# Altium PCB LDCFullN.PcbDoc (part 2 of 2)
Units mm, origin at the board's own origin, x right, y up, seen from the top; angles counter-clockwise.
Board outline 42.47 x 36.98 mm, 4 copper layers (Top Layer, GND, Power, Bottom Layer), stack 1.579 mm thick; 85 components, 54 nets, 294 pads, 82 vias.
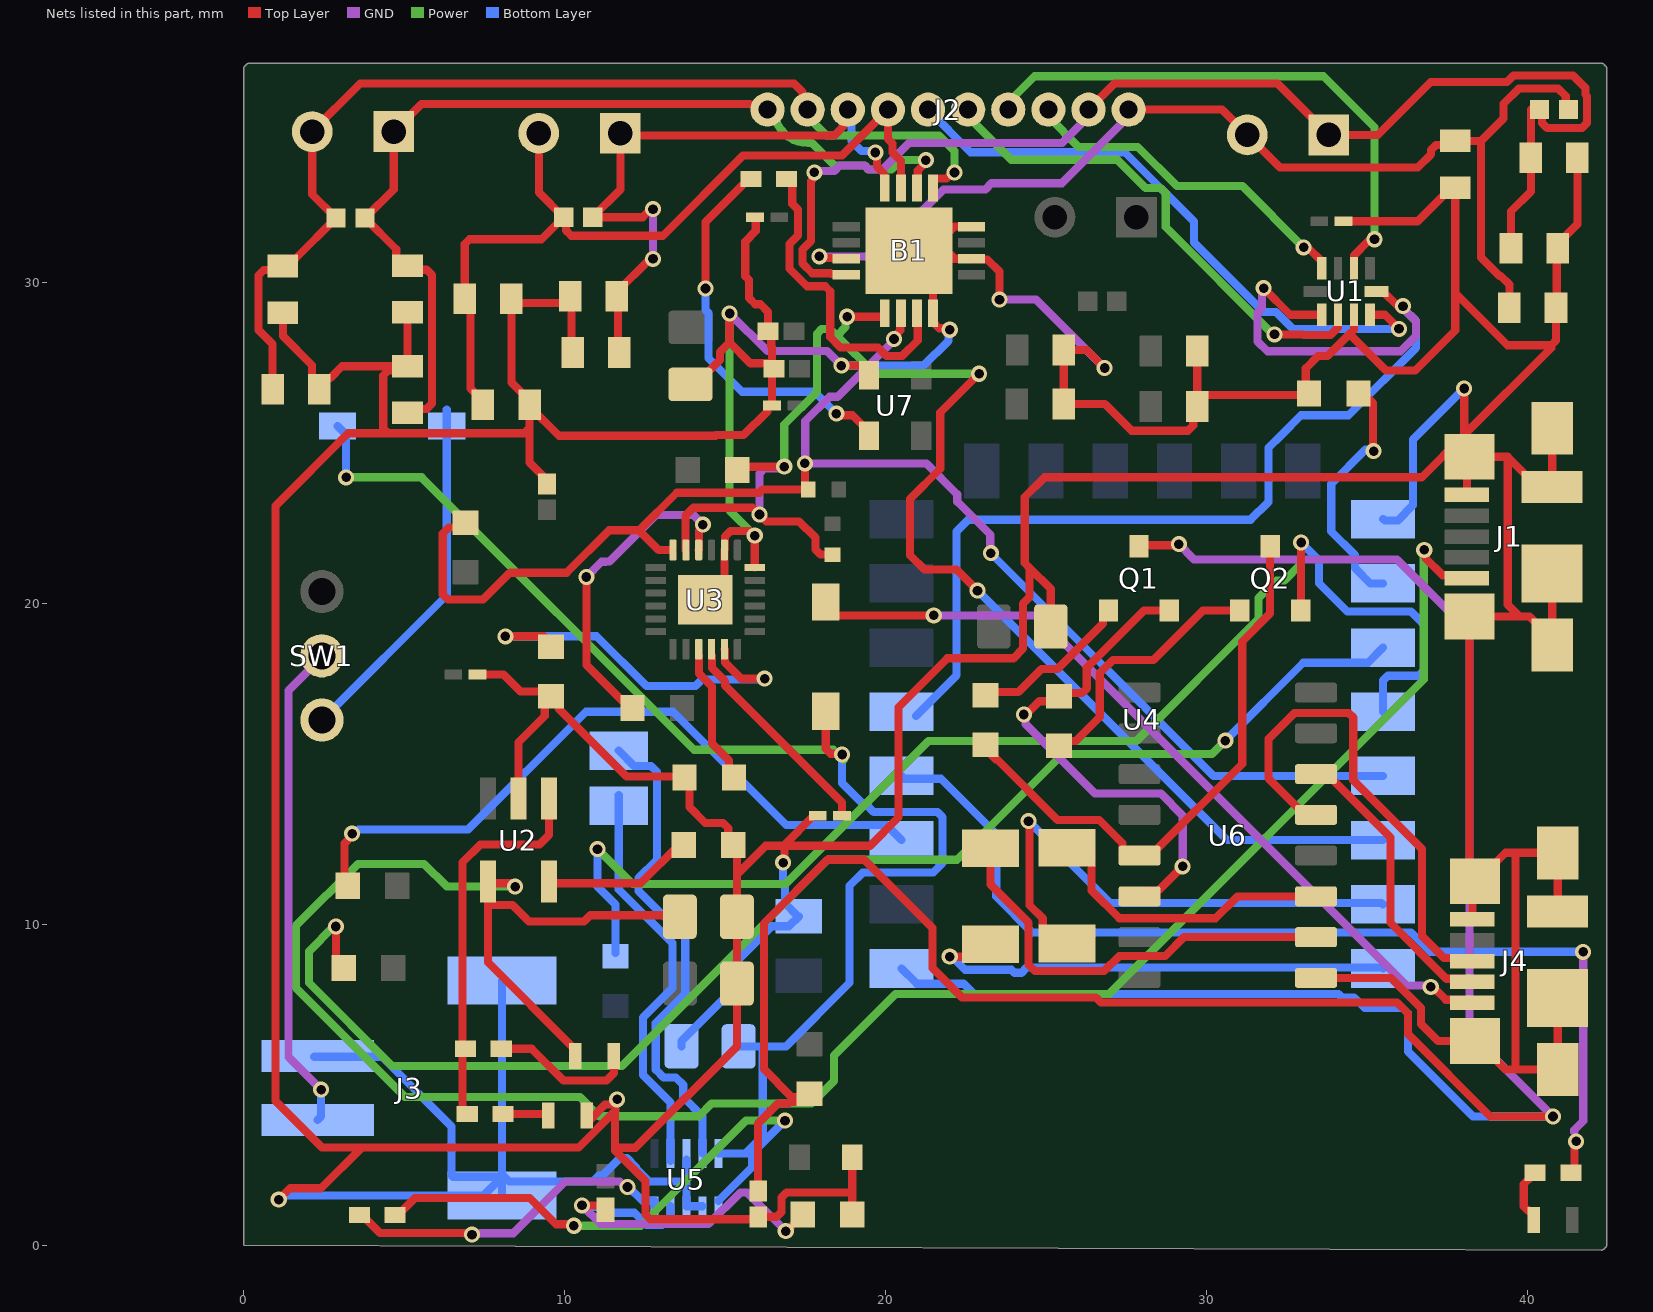
[diagram p4: the nets of this part, all layers, seen from the top]

## Via types
v1: diameter 0.5, hole 0.3, Top Layer to Bottom Layer, 81 vias
v2: diameter 0.5, hole 0.3, Top Layer to Bottom Layer, tented both sides, 1 vias

## Nets (pads, with @x,y where several pads share a name; then routed paths per layer and width w, separated by ;. In a path a pad name is that pad's centre, name@x,y a point inside that pad or via, vN(x,y) a via of type N, cw(c..) or ccw(c..) an arc to the next point about the centre after c; other vN are vias at no path point) (continued)
GND: B1.4 B1.6 B1.8 B1.17 C1.1 C2.1 C3.1 C4.1 C5.1 C8.2 C9.2 C10.2 C11.2 C12.1 C13.1 C14.1 C15.1 C16.1 C17.1 C18.1 C20.1 C21.1 C23.2 C24.2 C25.2 C26.2 C27.1 C28.1 C29.2 C30.2 C31.1 C32.1 C33.1 C35.2 C36.2 C50.2 J1.5 J1.S1 J1.S2 J1.S3 J1.S4 J1.S5 J1.S6 J3.1 J3.S1 J3.S2 J4.5 J4.S1 J4.S2 J4.S3 J4.S4 J4.S5 J4.S6 R8.1 R14.1 R15.1 R19.1 R22.1 R24.1 U1.3 U2.2 U3.18 U3.20 U3.25 U4.15 U5.2 U5.3 U5.8 U6.1 U7.2 | length 334.2
  Top Layer w0.254: v1(1.092,1.422) 1.448,1.778 2.413,1.778 3.683,3.048 ; C3.1@1.219,29.058 1.219,28.325 2.128,27.417 2.128,26.898 C2.1@2.227,26.798 ; C2.1@2.352,26.798 2.577,27.023 2.705,27.023 3.069,27.387 C9.2@5.105,27.387 ; C10.2@5.105,29.068 C9.2@5.105,27.387 ; C15.1@7.287,17.78 8.091,17.78 8.617,17.253 9.324,17.253 R15.1@9.512,17.065 ; C13.1@8.34,29.488 C13.1@8.34,29.362 ; U2.2@8.56,13.969 8.56,15.672 9.379,16.491 9.379,16.85 9.594,17.065 R15.1@9.619,17.065 ; C14.1@9.449,23.77 9.449,23.847 8.905,24.39 8.905,25.466 ; 9.811,16.72 11.925,14.605 13.555,14.605 13.883,14.277 13.883,13.65 14.379,13.155 14.936,13.155 15.098,12.993 15.098,12.723 15.35,12.471 15.367,12.471 15.367,11.557 ; C23.2@10.246,27.813 10.208,27.851 10.208,29.527 C24.2@10.17,29.566 9.967,29.362 C13.1@8.34,29.362 ; R14.1@10.785,3.909 11.261,4.386 11.406,4.386 11.567,4.547 v1(11.633,4.547) 11.586,4.5 11.586,4.195 11.572,4.18 ; C50.2@13.856,26.597 14.839,27.58 14.839,27.834 15.138,28.134 ; U3.25@14.376,20.117 14.976,20.717 U3.20@14.976,21.662 14.989,21.675 14.989,22.08 15.168,22.259 15.773,22.259 v1(15.921,22.11) U3.18@15.921,21.117 ; v1(15.138,29.032) 15.138,28.134 ; C1.1@15.366,8.153 C20.1@15.366,10.236 ; C1.1@15.366,8.153 15.367,6.198 12.211,3.042 11.572,3.042 ; C20.1@15.366,10.236 15.367,11.557 ; C27.1@15.951,32.055 15.951,31.598 15.627,31.274 15.627,30.19 15.739,30.078 15.739,29.515 15.936,29.318 16.097,29.318 16.337,29.078 C32.1@16.337,28.473 16.437,28.373 16.437,28.013 16.464,27.986 16.464,27.646 16.462,27.644 C28.1@16.462,27.305 ; C29.2@16.004,0.813 12.665,0.813 12.516,0.962 12.516,2.004 11.572,2.947 11.572,3.042 ; C29.2@16.027,0.888 16.605,0.888 16.754,1.037 16.754,1.486 16.916,1.649 18.961,1.649 ; v1(16.804,11.923) 16.846,11.964 16.846,12.446 ; C21.1@17.884,13.386 17.76,13.386 16.846,12.471 16.846,12.446 ; v1(18.618,27.407) 19.292,27.407 19.482,27.216 U7.2@19.482,27.153 ; R24.1@18.961,0.939 18.961,1.649 ; C35.2@18.961,2.743 18.961,1.649 ; B1.17@20.726,30.988 21.476,31.738 22.149,31.738 ; v1(21.996,28.524) 21.949,28.571 21.668,28.571 21.476,28.763 B1.4@21.476,29.038 21.476,30.265 21.949,30.738 22.149,30.738 ; B1.6@22.676,30.738 B1.6@22.653,30.738 ; B1.8@22.676,31.738 22.149,31.738 ; v1(23.546,29.464) 23.546,30.335 23.166,30.715 22.676,30.715 B1.6@22.653,30.738 ; 24.333,23.285 24.333,21.26 24.486,21.107 ; 24.333,23.31 24.95,23.927 36.703,23.927 J1.S2@38.024,25.248 ; C36.2@25.145,19.279 25.145,20.448 24.486,21.107 ; v1(26.822,27.33) 26.264,27.889 C5.1@25.552,27.889 25.547,27.884 25.547,26.218 C4.1@25.542,26.213 26.827,26.213 27.661,25.38 29.42,25.38 29.583,25.542 29.583,26.011 C11.2@29.708,26.137 C11.2@29.708,26.265 ; C8.2@29.708,27.864 C11.2@29.708,26.265 ; U6.1@33.408,8.331 35.742,8.331 36.677,7.396 36.677,6.896 37.207,6.367 J4.S1@38.363,6.367 ; C31.1@34.262,31.902 36.565,31.902 37.389,32.727 37.616,32.954 C18.1@37.744,32.954 37.744,29.673 ; U1.3@34.591,28.991 34.589,28.989 34.589,28.523 34.453,28.387 ; v1(38.024,26.695) J1.S2@38.024,25.248 ; J1.5@38.107,23.38 38.107,24.482 J1.S2@38.192,24.567 ; J4.5@38.278,10.154 38.278,11.257 J4.S2@38.363,11.342 38.192,11.512 J1.S1@38.192,19.592 39.751,19.592 ; J4.S1@38.425,6.367 39.313,5.479 39.628,5.479 ; J4.S2@38.425,11.342 39.313,12.229 39.628,12.229 ; J1.S3@40.767,18.705 J1.S3@40.767,18.88 ; J1.S4@40.767,20.93 J1.S3@40.767,18.88 ; J1.S6@40.767,25.455 J1.S5@40.767,23.63 40.317,23.63 39.38,24.567 ; J4.S4@40.938,7.704 J4.S3@40.938,5.479 39.628,5.479 ; J4.S5@40.938,10.404 J4.S6@40.938,12.229 39.628,12.229 ; C26.2@41.554,34.112 41.554,31.812 40.935,31.193 C25.2@40.935,31.064 40.909,31.039 40.909,29.235 C16.1@40.884,29.21 40.884,28.19 40.735,28.042 ; 3.683,3.048 2.438,3.048 0.991,4.496 0.991,23.038 3.251,25.298 8.738,25.298 8.893,25.454 ; 3.683,3.048 10.439,3.048 11.572,4.18 ; C9.2@5.105,27.387 4.98,27.261 4.511,27.261 4.348,27.099 4.348,25.454 4.497,25.305 8.741,25.305 8.89,25.454 8.893,25.454 ; C13.1@8.34,29.362 8.34,26.882 8.905,26.316 C12.1@8.905,26.187 ; 8.893,25.454 8.905,25.466 ; 8.905,25.466 C12.1@8.905,26.187 ; C12.1@8.905,26.187 8.905,26.135 9.818,25.222 14.696,25.222 14.717,25.243 15.575,25.243 16.312,25.981 16.312,26.137 16.338,26.162 C17.1@16.462,26.162 C28.1@16.462,27.305 ; 11.572,3.042 11.572,4.18 ; 15.138,28.134 15.794,27.478 16.289,27.478 C28.1@16.462,27.305 ; 15.367,11.557 16.256,12.446 16.846,12.446 ; 16.846,12.446 19.507,12.446 20.396,13.335 20.396,16.764 21.92,18.288 23.978,18.288 24.282,18.593 24.282,19.99 24.486,20.193 24.486,21.107 ; 22.149,30.738 21.946,30.941 21.946,31.535 22.149,31.738 ; 22.149,30.738 B1.6@22.653,30.738 ; C11.2@29.708,26.265 29.933,26.49 30.23,26.49 33.035,26.49 33.088,26.543 33.088,27.322 33.467,27.701 33.767,27.701 34.453,28.387 ; 34.453,28.387 35.585,27.254 36.5,27.254 37.744,28.499 37.744,29.673 ; 37.744,29.673 39.376,28.042 40.735,28.042 ; J1.S2@38.024,25.248 40.735,27.959 40.735,28.042 ; J1.S2@38.024,25.248 38.024,24.735 J1.S2@38.192,24.567 ; J1.S2@38.192,24.567 39.38,24.567 ; 39.38,24.567 39.38,19.964 39.751,19.592 ; 39.628,5.479 39.628,12.229 ; 39.751,19.592 40.055,19.592 J1.S3@40.767,18.88
  GND w0.254: v1(15.138,29.032) 16.314,27.857 18.168,27.857 v1(18.618,27.407) ; v1(23.546,29.464) 24.689,29.464 v1(26.822,27.33)
  Power w0.254: v1(15.138,29.032) 15.138,22.893 v1(15.921,22.11)
  Bottom Layer w0.254: v1(1.092,1.422) 1.159,1.422 1.286,1.549 7.468,1.549 J3.S2@8.052,2.134 ; J3.1@2.2,5.874 4.311,5.874 6.479,3.707 6.479,2.172 6.518,2.134 J3.S2@8.052,2.134 ; J3.S2@8.052,1.549 8.052,2.062 8.126,2.136 8.274,1.988 10.88,1.988 11.064,2.172 11.18,2.172 11.727,2.718 11.937,2.718 12.214,2.442 12.214,2.412 12.633,1.993 13.741,1.993 ; J3.S1@8.052,8.249 J3.S2@8.052,2.134 ; C33.1@13.641,6.198 13.641,6.363 15.247,7.969 15.247,8.73 16.459,9.942 16.99,9.942 C30.2@17.297,10.249 17.272,10.249 16.866,10.655 16.866,11.165 16.804,11.226 v1(16.804,11.923) ; U5.3@13.792,1.388 13.792,1.942 13.741,1.993 ; U5.3@13.794,1.215 U5.2@14.294,1.215 ; U5.8@13.794,2.665 13.794,2.046 13.741,1.993 ; v1(18.618,27.407) 21.184,27.407 21.957,28.18 21.957,28.484 v1(21.996,28.524) ; U4.15@35.496,22.623 35.56,22.585 35.96,22.585 36.433,23.058 36.433,25.105 v1(38.024,26.695)
GPIO0: Q2.2 R20.1 U4.18 | length 42.3
  Top Layer w0.254: Q2.2@32.929,19.777 32.944,19.792 v1(32.944,21.895)
  Power w0.254: v1(11.024,12.344) 12.116,11.252 16.879,11.252 21.339,15.712 27.811,15.712 31.62,19.521 31.62,20.164 32.173,20.717 32.427,20.717 32.944,21.234 v1(32.944,21.895)
  Bottom Layer w0.254: v1(11.024,12.344) 11.024,11.172 11.582,10.613 R20.1@11.582,9.101 ; v1(32.944,21.895) 33.502,21.336 33.502,20.626 34.381,19.746 36.365,19.746 36.773,19.338 36.773,17.909 36.611,17.746 35.645,17.746 35.496,17.598 U4.18@35.496,16.623
GPIO2: R36.2 U4.17 | length 43.4
  Top Layer w0.254: v1(2.87,9.931) 2.87,8.78 R36.2@3.014,8.636
  Power w0.254: v1(2.87,9.931) 2.804,9.931 2.032,9.16 2.032,8.179 4.62,5.59 11.788,5.59 18.209,12.011 22.22,12.011 25.517,15.308 30.167,15.308 v1(30.582,15.723)
  Bottom Layer w0.254: v1(30.582,15.723) 33.009,18.15 35.023,18.15 U4.17@35.496,18.623
GPIO14: U1.1 U1.5 U4.5 | length 36.7
  Top Layer w0.254: v1(31.775,29.82) 32.604,28.991 U1.1@33.591,28.991 ; U1.5@35.293,29.718 35.496,29.718 35.953,29.261 v1(36.119,29.261)
  GND w0.254: v1(31.775,29.82) 31.728,29.773 31.728,29.203 31.587,29.062 31.587,28.162 31.896,27.853 36.041,27.853 36.519,28.331 36.519,28.794 36.119,29.194 v1(36.119,29.261)
  Bottom Layer w0.254: U4.5@20.942,16.494 22.206,17.758 22.206,22.235 22.577,22.606 31.373,22.606 31.928,23.161 31.928,24.847 32.331,25.25 32.941,25.86 34.417,25.86 36.519,27.961 36.519,28.794 36.119,29.194 v1(36.119,29.261)
GPIO16: R37.2 U4.4 | length 31.4
  Top Layer w0.254: R37.2@41.348,2.261 41.463,2.375 41.463,3.193 v1(41.51,3.24) ; v1(41.732,9.144) v1@41.74,9.144
  GND w0.254: 41.453,3.531 41.453,3.597 41.732,3.877 v1(41.732,9.144)
  Bottom Layer w0.254: U4.4@20.496,14.623 20.585,14.535 21.728,14.535 23.444,12.819 23.444,10.868 24.565,9.746 36.365,9.746 36.967,9.144 v1(41.732,9.144)
I1: B1.11 C12.2 C13.2 C19.2 C39.2 J2.7 | length 26.7
  Top Layer w0.254: C13.2@6.886,29.488 6.886,31.195 7.035,31.344 9.281,31.344 C19.2@9.968,32.029 ; C13.2@7.068,29.761 7.068,26.689 7.217,26.54 7.228,26.54 7.452,26.316 C12.2@7.452,26.187 ; C39.2@9.195,34.646 9.195,32.801 C19.2@9.968,32.029 ; B1.11@20.476,32.938 20.476,33.78 20.212,34.044 20.212,34.326 20.07,34.468 J2.7@20.07,35.382 18.641,33.953 15.559,33.953 13.058,31.452 10.206,31.452 10.043,31.615 10.043,32.029 10.006,32.067 C19.2@9.968,32.029 C19.2@9.968,32.029
I2: B1.12 C19.1 C23.1 C24.1 C39.1 J2.8 | length 21.1
  Top Layer w0.254: C19.1@10.871,32.029 C19.1@10.873,32.029 ; C23.1@11.699,27.685 11.661,27.723 11.661,29.527 C24.1@11.623,29.566 11.623,29.694 12.663,30.734 v1(12.751,30.734) ; v1(12.751,32.283) 12.684,32.283 12.43,32.029 C19.1@10.873,32.029 ; J2.8@18.82,35.382 18.664,35.227 18.664,34.836 18.4,34.572 11.809,34.572 C39.1@11.735,34.646 11.735,32.891 C19.1@10.873,32.029 ; v1(19.681,34.047) 19.728,34 19.728,33.609 19.953,33.383 19.953,32.961 B1.12@19.976,32.938
  GND w0.254: v1@12.751,30.6 v1(12.751,32.283)
  Bottom Layer w0.254: J2.8@18.82,35.382 18.939,35.263 18.939,34.401 19.245,34.095 19.634,34.095 v1(19.681,34.047)
IN0A: B1.9 C2.2 C3.2 C6.2 C37.2 J2.9 | length 33.4
  Top Layer w0.254: C2.2@0.899,26.67 0.899,28.074 0.462,28.511 0.462,30.223 0.624,30.385 1.094,30.385 C3.2@1.219,30.511 1.444,30.735 1.606,30.735 C6.2@2.876,32.004 ; C6.2@2.876,32.004 C6.2@2.876,32.004 ; J2.9@17.57,35.382 17.414,35.538 17.414,35.926 17.147,36.193 3.63,36.193 C37.2@2.134,34.696 2.134,32.745 C6.2@2.876,32.004 ; B1.9@21.476,32.938 21.476,33.213 21.499,33.236 21.892,33.236 22.078,33.422 v1(22.144,33.422)
  Power w0.254: J2.9@17.57,35.382 17.57,35.163 18.161,34.572 19.155,34.572 19.158,34.574 19.731,34.574 19.734,34.572 21.664,34.572 22.144,34.091 v1(22.144,33.422)
IN0B: B1.10 C6.1 C9.1 C10.1 C37.1 J2.10 | length 29.9
  Top Layer w0.254: C6.1@3.779,32.004 C6.1@3.779,32.004 ; C9.1@5.105,25.933 5.231,26.059 5.7,26.059 5.862,26.221 5.862,30.233 5.7,30.395 5.231,30.395 C10.1@5.105,30.521 4.977,30.521 4.752,30.745 4.752,31.032 C6.1@3.779,32.004 ; J2.10@16.32,35.382 16.164,35.538 15.784,35.538 15.765,35.558 5.535,35.558 C37.1@4.674,34.696 4.674,32.897 C6.1@3.779,32.004 ; B1.10@20.976,32.938 20.999,32.961 20.999,33.489 21.251,33.741 v1(21.251,33.807)
  Power w0.254: J2.10@16.32,35.382 cw(c16.302,35.129) 16.551,35.18 ccw(c17.57,35.382) 17.586,34.343 17.595,34.343 ; 17.596,34.343 17.701,34.343 18.407,33.637 19.35,33.637 19.467,33.52 20.182,33.52 20.469,33.807 v1(21.251,33.807)
IN3A: B1.15 C16.2 C18.2 C22.2 C40.2 J2.1 | length 34.7
  Top Layer w0.254: v1(17.932,30.81) 17.979,30.763 18.251,30.763 18.253,30.761 18.73,30.761 B1.15@18.776,30.715 ; J2.1@27.57,35.382 30.48,35.382 C40.2@31.267,34.595 32.283,33.579 36.576,33.579 36.987,33.99 36.987,34.119 37.15,34.282 37.619,34.282 C18.2@37.744,34.407 38.547,34.407 ; C16.2@39.431,29.21 39.431,29.937 39.164,30.203 39.119,30.203 38.547,30.775 38.547,34.407 ; C22.2@41.275,35.382 41.188,35.382 41.188,35.808 40.952,36.045 39.725,36.045 39.246,35.565 39.246,35.106 38.547,34.407
  GND w0.254: v1(17.932,30.81) 20.091,30.81 20.394,31.113 20.394,31.492 21.798,32.895 23.107,32.895 23.302,33.09 25.497,33.09 27.57,35.163 J2.1@27.57,35.382
IN3B: B1.16 C22.1 C25.1 C26.1 C40.1 J2.2 | length 39.4
  Top Layer w0.254: v1(17.78,33.426) 17.733,33.379 17.733,33.217 17.67,33.155 17.67,31.293 17.405,31.028 17.405,30.592 17.714,30.283 18.285,30.283 18.308,30.261 18.753,30.261 B1.16@18.776,30.238 ; J2.2@26.32,35.382 27.13,36.193 32.21,36.193 C40.1@33.807,34.595 35.331,34.595 36.982,36.246 39.355,36.246 39.558,36.449 41.412,36.449 41.8,36.062 41.8,35.851 41.854,35.797 41.854,34.967 41.691,34.805 40.609,34.805 40.447,34.967 40.447,35.307 C22.1@40.372,35.382 40.101,35.382 40.101,33.884 40.101,32.835 39.482,32.216 C25.1@39.482,31.064
  GND w0.254: v1(17.78,33.426) 17.827,33.473 18.402,33.473 18.565,33.637 19.346,33.637 19.463,33.52 19.899,33.52 20.722,34.343 25.5,34.343 26.32,35.163 J2.2@26.32,35.382
M1: J2.5 U1.2 | length 15.7
  Top Layer w0.254: v1(32.114,28.38) 33.005,28.38 33.024,28.361 33.856,28.361 34.089,28.594 34.089,28.989 U1.2@34.091,28.991
  Power w0.254: J2.5@22.57,35.382 22.57,35.163 23.914,33.818 27.218,33.818 28.095,32.941 28.563,32.941 28.725,32.779 28.725,31.727 32.072,28.38 v1(32.114,28.38)
M2: J2.6 U1.4 | length 19
  Top Layer w0.254: U1.4@35.091,28.991 35.551,28.991 v1(35.992,28.55)
  Bottom Layer w0.254: J2.6@21.32,35.382 22.647,34.055 27.449,34.055 29.612,31.892 29.612,31.238 31.774,29.075 32.164,29.075 32.69,28.55 v1(35.992,28.55)
NegD: J4.2 U6.6 | length 9.1
  Top Layer w0.254: U6.6@33.408,14.681 33.753,14.681 35.729,12.705 35.729,10.05 37.477,8.302 38.18,8.302 J4.2@38.278,8.204
NetB1_3: B1.3 R3.2 | length 10.1
  Top Layer w0.254: R3.2@16.914,33.223 16.965,33.223 17.092,33.096 17.092,32.446 17.266,32.272 17.266,31.461 17.001,31.196 17.001,30.425 17.547,29.879 18.118,29.879 18.274,29.723 18.274,28.296 18.598,27.972 19.766,27.972 20.029,27.708 20.515,27.708 20.999,28.193 20.999,29.015 B1.3@20.976,29.038
NetC20_2: C20.2 J1.1 R10.2 U2.4 | length 71.8
  Top Layer w0.254: U2.4@7.61,11.278 8.289,11.278 8.392,11.176 v1(8.458,11.176) ; R10.2@10.325,5.893 10.296,5.893 10.296,6.132 7.61,8.818 7.61,10.601 7.61,10.728 7.737,10.601 8.373,10.601 8.89,10.084 10.602,10.084 10.803,10.285 13.542,10.285 C20.2@13.59,10.236 ; v1(36.779,21.666) 36.826,21.619 36.826,21.404 37.352,20.878 38.009,20.878 J1.1@38.107,20.78
  Power w0.254: v1(8.458,11.176) 6.328,11.176 5.619,11.885 3.556,11.885 1.628,9.957 1.628,8.011 5.019,4.62 10.477,4.62 11.078,4.02 14.186,4.02 14.579,4.413 17.687,4.413 18.394,5.12 18.394,5.912 20.311,7.83 26.964,7.83 36.765,17.63 36.765,21.652 v1(36.779,21.666)
NetC21_2: C21.2 U3.10 | length 6.7
  Top Layer w0.254: U3.10@14.585,18.379 14.585,17.986 14.997,17.574 14.997,17.439 18.642,13.794 18.642,13.411 18.641,13.41 C21.2@18.641,13.386
NetCR1_2: CR1.2 J4.1 | length 25.5
  Top Layer w0.254: CR1.2@18.136,20.195 18.136,19.92 18.432,19.623 v1(21.498,19.623) ; v1(36.982,8.052) 37.049,8.052 37.449,7.652 38.18,7.652 J4.1@38.278,7.554
  GND w0.254: v1(21.498,19.623) 24.7,19.623 36.224,8.099 36.936,8.099 v1(36.982,8.052)
NetCR2_2: CR2.2 SW1.3 | length 11.3
  Bottom Layer w0.254: SW1.3@2.438,16.364 6.327,20.253 6.327,26.035
NetJ3_2: J3.2 SW1.2 | length 15.4
  GND w0.254: v1(2.413,4.851) 1.399,5.865 1.399,17.288 2.438,18.327 SW1.2@2.438,18.364
  Bottom Layer w0.254: J3.2@2.302,3.899 2.413,4.011 v1(2.413,4.851)
NetL2_1: L2.1 U5.7 | length 12.8
  Bottom Layer w0.254: L2.1@11.684,14.024 11.684,11.083 13.354,9.413 13.354,8.012 12.435,7.093 12.435,5.302 13.292,4.445 U5.7@13.292,2.63
NetL2_2: L2.2 U5.9 | length 15.4
  Bottom Layer w0.254: L2.2@11.684,15.411 12.157,14.938 12.686,14.938 12.871,14.753 12.871,12.011 12.3,11.44 12.3,11.038 13.758,9.58 13.758,7.845 12.839,6.925 12.839,5.47 13.078,5.231 13.46,5.231 13.696,4.994 13.696,4.612 14.294,4.014 U5.9@14.294,2.865
NetQ1_1: Q1.1 R29.2 | length 5
  Top Layer w0.254: R29.2@23.114,17.238 24.132,17.238 24.854,17.959 25.355,17.959 26.766,19.37 26.766,19.604 Q1.1@26.939,19.777
NetQ1_2: Q1.2 R32.1 U6.14 | length 16
  Top Layer w0.254: v1(24.308,16.535) 24.374,16.535 24.791,16.952 25.148,16.952 25.4,17.204 26.118,17.204 26.267,17.353 26.267,17.997 28.048,19.777 Q1.2@28.839,19.777 Q1.2@28.839,19.827 ; U6.14@27.908,10.871 28.091,11.054 28.504,11.054 v1(29.254,11.805)
  GND w0.254: v1(24.308,16.535) 24.355,16.488 24.355,16.236 26.52,14.072 28.575,14.072 29.254,13.392 v1(29.254,11.805)
NetQ2_1: Q2.1 R32.2 | length 8.2
  Top Layer w0.254: R32.2@25.4,15.46 25.652,15.712 25.921,15.712 26.671,16.462 26.671,17.829 27.079,18.237 28.341,18.237 29.881,19.777 Q2.1@31.029,19.777
NetQ2_3: Q2.3 R29.1 U6.13 | length 17.9
  Top Layer w0.254: R29.1@23.114,15.494 23.114,15.447 23.418,15.143 23.465,15.143 25.355,13.253 26.654,13.253 27.38,12.527 27.38,12.324 27.563,12.141 U6.13@27.908,12.141 28.253,12.141 31.109,14.997 31.109,18.815 31.979,19.685 Q2.3@31.979,21.777
NetR3_1: R3.1 U7.3 | length 12.4
  Top Layer w0.254: v1(14.385,29.811) 14.385,31.88 15.728,33.223 R3.1@15.802,33.223 ; v1(18.466,25.908) 18.513,25.861 18.97,25.861 19.482,25.349 U7.3@19.482,25.171
  Bottom Layer w0.254: v1(14.385,29.811) 14.385,29.145 14.478,29.053 14.478,27.635 15.522,26.591 17.782,26.591 v1(18.466,25.908)
NetR5_1: R5.1 R21.1 U2.1 | length 12.2
  Top Layer w0.254: R21.1@6.867,4.089 6.812,4.145 6.812,6.121 6.861,6.121 6.814,6.169 6.814,11.933 7.371,12.491 9.217,12.491 9.51,12.783 U2.1@9.51,13.969
NetR5_2: R5.2 R10.1 | length 4.4
  Top Layer w0.254: R5.2@8.124,6.121 8.975,6.121 9.965,5.131 11.298,5.131 11.532,5.364 R10.1@11.532,5.893
NetR8_2: R8.2 U2.5 | length 4.6
  Top Layer w0.254: U2.5@9.51,11.278 12.366,11.278 13.559,12.471 R8.2@13.606,12.471
NetR14_2: R14.2 R21.2 | length 1.4
  Top Layer w0.254: R21.2@8.082,4.089 9.442,4.089 R14.2@9.483,4.049
NetR15_2: R15.2 U3.11 | length 12.2
  Top Layer w0.254: v1(8.153,18.974) 9.347,18.974 R15.2@9.576,18.745 ; U3.11@14.976,18.572 14.989,18.559 14.989,18.153 15.49,17.653 v1(16.231,17.653)
  Bottom Layer w0.254: v1(8.153,18.974) 10.996,18.974 12.548,17.422 14.075,17.422 14.281,17.628 16.205,17.628 v1(16.231,17.653)
NetR16_2: R16.2 U3.22 | length 10
  Top Layer w0.254: v1(10.675,20.82) 10.675,18.077 R16.2@12.014,16.739 ; U3.22@14.176,21.662 14.189,21.675 14.189,22.274 14.303,22.387 v1(14.303,22.454)
  GND w0.254: v1(10.675,20.82) 11.152,21.297 11.27,21.297 11.277,21.304 11.398,21.304 12.842,22.748 14.008,22.748 v1@14.288,22.469
NetR19_2: R19.2 U3.9 | length 4.3
  Top Layer w0.254: U3.9@14.18,18.379 14.18,17.819 14.593,17.407 14.593,15.631 15.123,15.101 15.123,14.832 R19.2@15.375,14.58
NetR22_2: R22.2 U4.16 | length 7.8
  Top Layer w0.254: R22.2@34.832,26.543 34.878,26.543 35.183,26.239 35.183,24.761 v1(35.204,24.74)
  Bottom Layer w0.254: v1(35.204,24.74) 35.157,24.787 34.947,24.787 33.884,23.724 33.884,22.244 34.623,21.505 34.623,21.096 35.096,20.623 U4.16@35.496,20.623
NetR24_2: R24.2 R25.1 U5.4 | length 12.7
  Top Layer w0.254: v1(10.541,1.245) 11.138,1.245 R25.1@11.278,1.105 ; v1(16.888,0.443) 16.915,0.443 17.412,0.94 R24.2@17.412,0.965 R24.2@17.281,1.096
  GND w0.254: v1(10.541,1.245) 11.125,0.66 14.486,0.66 15.473,1.647 15.683,1.647 v1(16.888,0.443)
  Bottom Layer w0.254: v1(10.541,1.245) 10.588,1.198 11.164,1.198 11.348,1.014 12.179,1.014 12.554,0.638 13.034,0.638 13.292,0.896 13.292,1.213 U5.4@13.294,1.215
NetR26_2: R26.2 U5.5 | length 10.6
  Top Layer w0.254: R26.2@3.613,0.94 3.691,0.94 4.249,0.381 6.887,0.381 6.891,0.377 7.065,0.377 v1@7.087,0.356
  GND w0.254: v1@6.978,0.377 8.404,0.377 10.018,1.991 11.716,1.991 11.89,1.817 v1(11.957,1.817)
  Bottom Layer w0.254: v1(11.957,1.817) 11.991,1.817 12.42,1.388 12.792,1.388 12.794,1.386 U5.5@12.794,1.215
  other v1: 7.112,0.33
NetR27_1: R27.1 R37.1 | length 1.8
  Top Layer w0.254: R27.1@40.189,0.787 40.189,0.997 40.119,1.067 40.027,1.067 39.878,1.216 39.878,1.902 40.036,2.06 40.036,2.134 40.163,2.261 R37.1@40.236,2.261
NetR30_2: R30.2 U6.2 | length 13.6
  Top Layer w0.254: R30.2@23.266,12.365 23.266,11.239 24.454,10.051 24.454,8.741 24.654,8.541 26.806,8.541 27.279,9.014 28.71,9.014 29.297,9.601 U6.2@33.408,9.601
NetR31_2: R31.2 U6.3 | length 9.5
  Top Layer w0.254: R31.2@25.654,12.391 25.954,12.391 26.412,11.933 26.412,11.056 27.279,10.188 30.277,10.188 30.96,10.871 U6.3@33.408,10.871
NetR35_2: R35.2 U4.3 | length 22.1
  Top Layer w0.254: R35.2@3.141,11.201 3.141,12.524 3.378,12.76 v1(3.378,12.827)
  Bottom Layer w0.254: v1(3.378,12.827) 3.445,12.827 3.574,12.956 6.994,12.956 10.659,16.621 13.379,16.621 16.904,13.096 20.023,13.096 U4.3@20.496,12.623
PosD: J4.3 U6.5 | length 15.8
  Top Layer w0.254: U6.5@33.408,13.411 33.063,13.411 31.925,14.549 31.925,15.78 32.731,16.586 34.421,16.586 34.569,16.437 34.569,14.486 36.709,12.346 36.709,9.641 37.399,8.952 38.18,8.952 J4.3@38.278,8.854
R1: J2.3 U1.9 | length 10.8
  Top Layer w0.254: v1(33.02,31.09) 33.067,31.043 33.196,31.043 33.591,30.648 U1.9@33.591,30.445
  Power w0.254: J2.3@25.07,35.382 25.07,35.163 26.01,34.222 27.853,34.222 29.078,32.997 31.112,32.997 v1(33.02,31.09)
R2: J2.4 U1.7 | length 17.4
  Top Layer w0.254: U1.7@34.591,30.445 34.593,30.447 34.593,30.842 35.048,31.297 35.183,31.297 v1(35.23,31.344)
  Power w0.254: J2.4@23.82,35.382 23.82,35.602 24.639,36.421 33.643,36.421 35.23,34.834 v1(35.23,31.344)
RST1: C29.1 Q1.3 R28.2 U4.1 | length 90.7
  Top Layer w0.254: C29.1@16.027,1.766 16.027,3.793 16.647,4.413 16.981,4.413 17.039,4.472 17.476,4.472 17.628,4.623 17.069,4.623 16.205,5.486 16.205,10.033 18.186,12.014 19.329,12.014 21.463,9.881 21.463,8.636 22.377,7.722 26.559,7.722 26.711,7.569 35.933,7.569 36.273,7.229 36.273,6.729 36.273,6.577 38.837,4.013 v1(40.792,4.013) ; Q1.3@27.889,21.777 27.923,21.811 29.1,21.811 v1(29.134,21.844)
  GND w0.254: v1(29.134,21.844) 29.61,21.368 35.935,21.368 38.192,19.11 38.192,6.614 v1(40.792,4.013)
  Bottom Layer w0.254: U4.1@20.496,8.624 20.969,8.151 22.429,8.151 22.75,7.83 34.106,7.83 34.214,7.722 34.595,7.722 34.926,7.391 36.111,7.391 36.273,7.229 36.273,6.043 38.303,4.013 v1(40.792,4.013)
RX: R30.1 U4.22 | length 15.2
  Top Layer w0.254: v1(21.996,8.992) 22.881,8.992 R30.1@23.266,9.377
  Bottom Layer w0.254: v1(21.996,8.992) 22.063,8.992 22.469,8.585 23.921,8.585 24.017,8.489 24.228,8.489 24.391,8.653 35.467,8.653 U4.22@35.496,8.624
SCL: B1.1 R1.2 R17.2 U3.23 U4.20 | length 47.3
  Top Layer w0.254: U3.23@13.767,21.662 13.767,22.739 14.008,22.981 15.856,22.981 v1(16.069,22.768) 16.281,22.555 17.303,22.555 17.812,22.047 17.812,21.682 17.974,21.52 R1.2@18.338,21.52 ; R17.2@15.477,24.155 15.578,24.257 v1(16.84,24.257) ; v1(18.801,28.928) 19.953,28.928 19.976,28.951 B1.1@19.976,29.038 ; v1(22.86,20.396) 22.206,21.05 21.207,21.05 20.758,21.499 20.758,23.249 21.702,24.193 21.702,25.943 v1(22.911,27.153)
  GND w0.254: v1(16.069,22.768) 16.069,24.044 16.234,24.21 16.793,24.21 v1(16.84,24.257)
  Power w0.254: v1(16.84,24.257) 16.84,25.567 17.856,26.583 17.856,28.397 18.005,28.546 18.27,28.546 18.482,28.335 ; v1(18.801,28.928) 18.754,28.881 18.754,28.607 18.482,28.335 ; v1(22.911,27.153) 19.664,27.153 18.482,28.335
  Bottom Layer w0.254: v1(22.86,20.396) 30.633,12.623 U4.20@35.496,12.623
SDA: B1.2 R2.2 R18.2 U3.24 U4.19 | length 46.4
  Top Layer w0.254: R18.2@6.909,22.614 6.657,22.362 6.388,22.362 6.2,22.175 6.2,20.278 6.363,20.115 7.455,20.115 8.295,20.955 10.065,20.955 11.386,22.276 12.319,22.276 ; U3.24@13.36,21.666 12.929,21.666 12.319,22.276 ; v1(17.482,24.36) 17.482,23.818 17.483,23.816 17.483,23.614 R2.2@17.577,23.52 ; R2.2@17.583,23.546 16.169,23.546 16.07,23.447 13.49,23.447 12.319,22.276 ; v1(20.258,28.235) 20.258,28.302 20.453,28.497 20.453,29.015 B1.2@20.476,29.038
  GND w0.254: v1(20.258,28.235) 20.258,28.198 18.495,26.435 18.248,26.435 17.494,25.682 17.494,24.372 v1(17.482,24.36) 21.268,24.36 22.231,23.397 22.231,23.168 23.26,22.138 23.26,21.577 v1(23.275,21.562)
  Bottom Layer w0.254: v1(23.275,21.562) 30.214,14.623 U4.19@35.496,14.623
TX: R31.1 U4.21 | length 16.6
  Top Layer w0.254: v1(24.45,13.217) 24.482,13.184 24.482,10.595 24.896,10.181 24.896,9.861 25.354,9.403 R31.1@25.654,9.403
  Bottom Layer w0.254: v1(24.45,13.217) 26.998,10.668 35.452,10.668 U4.21@35.496,10.623
VBAT: C33.2 CR1.1 CR2.1 R26.1 U5.1 U5.10 | length 60.9
  Top Layer w0.254: R26.1@4.82,0.909 4.82,0.963 5.333,1.476 8.912,1.476 9.732,0.657 10.24,0.657 v1(10.287,0.61) ; CR1.1@18.136,16.637 18.136,15.465 18.284,15.316 18.618,15.316 v1(18.644,15.291)
  Power w0.254: v1(3.192,23.927) 5.546,23.927 14.033,15.439 18.372,15.439 18.684,15.127 v1@18.706,15.127 ; v1(10.287,0.61) 12.37,0.61 15.646,3.886 v1(16.866,3.886)
  Bottom Layer w0.254: CR2.1@2.921,25.527 3.192,25.256 v1(3.192,23.927) ; U5.10@14.794,2.865 15.634,2.865 ; U5.1@14.796,1.388 15.844,2.436 15.844,2.865 ; C33.2@15.417,6.198 16.154,6.198 ; v1(16.866,3.886) 15.844,2.865 ; v1@18.644,15.189 18.644,14.4 19.284,13.76 19.368,13.76 19.627,13.5 21.611,13.5 21.773,13.338 21.773,11.909 21.481,11.617 19.288,11.617 18.872,11.201 18.872,8.179 16.891,6.198 16.154,6.198 ; 15.634,2.865 15.844,2.865 ; 15.634,2.865 16.171,3.402 16.171,6.18 16.154,6.198
pads on no net: B1.5 J1.2 J1.3 J1.4 J4.4 U3.2 U3.3 U3.4 U3.5 U3.6 U3.7 U3.12 U3.14 U3.15 U3.16 U3.17 U3.19 U3.21 U4.2 U4.6 U4.7 U4.9 U4.10 U4.11 U4.12 U4.13 U4.14 U6.7 U6.8 U6.9 U6.10 U6.11 U6.12 U6.15

## Silkscreen, mask and mechanical layers (free items; w line width, h text height)
Top Overlay:
  lines w0.15: 38.024,14.3 41.986,14.3 41.986,16.155 38.024,16.155 38.024,14.3
  text "CHGR" at 39.243,16.662 h0.7
  text "NYIT" at 38.1,14.478 h1
  text "+" at 1.067,2.558 h0.5
Bottom Overlay:
  text "G" at 1.346,7.239 h0.7 r90
Board_Outline (Mech6):
  the board outline again, w0.1
Mechanical 20:
  the board outline again, w0.1

## Text inside footprints (layer, text, board x,y; h text height)
CR1: Top Overlay "*" at 17.247,15.545 h1.27 r90; Mechanical 13 "*" at 17.247,15.545 h1.27 r90
CR2: Mechanical 13 "*" at 1.829,24.638 h1.27 r180; Bottom Overlay "*" at 1.829,24.638 h1.27 r180
U1: Mechanical 13 "*" at 33.976,29.025 h1.27 r90
U2: Top Overlay "*" at 10.084,14.783 h1.27 r270